# EAGLE board unicode_names (EAGLE 9.6.2)

No outline drawn. Coordinates in mm, seen from the top.
Copper layers used: 

## Footprints (pad centres in the part's own frame; a part is rotated, then mirrored left to right if it is on the bottom)
RÉSISTANCE_日本 = smd 1 x 1: 1 -1,0; 2 1,0

## Placement (x,y rotation side)
Ω1  10 kΩ ±5 % 日本語 😀  [RÉSISTANCE_日本]  5,5 180 bottom

## Library data of the parts
Ω1 = ünï

## Nets
Señal_日本: Ω1.1 Ω1.2